# Altium PCB Control Board-v1.0.PcbDoc (part 5 of 8)
Units mil, origin at the board's own origin, x right, y up, seen from the top; angles counter-clockwise.
Board outline 7874.02 x 5118.11 mil, 4 copper layers (Top Layer, Layer 1, Layer 2, Bottom Layer), stack 61.654 mil thick; 475 components, 366 nets, 1579 pads, 587 vias.
Unrouted connection lines stored in the file: 427.
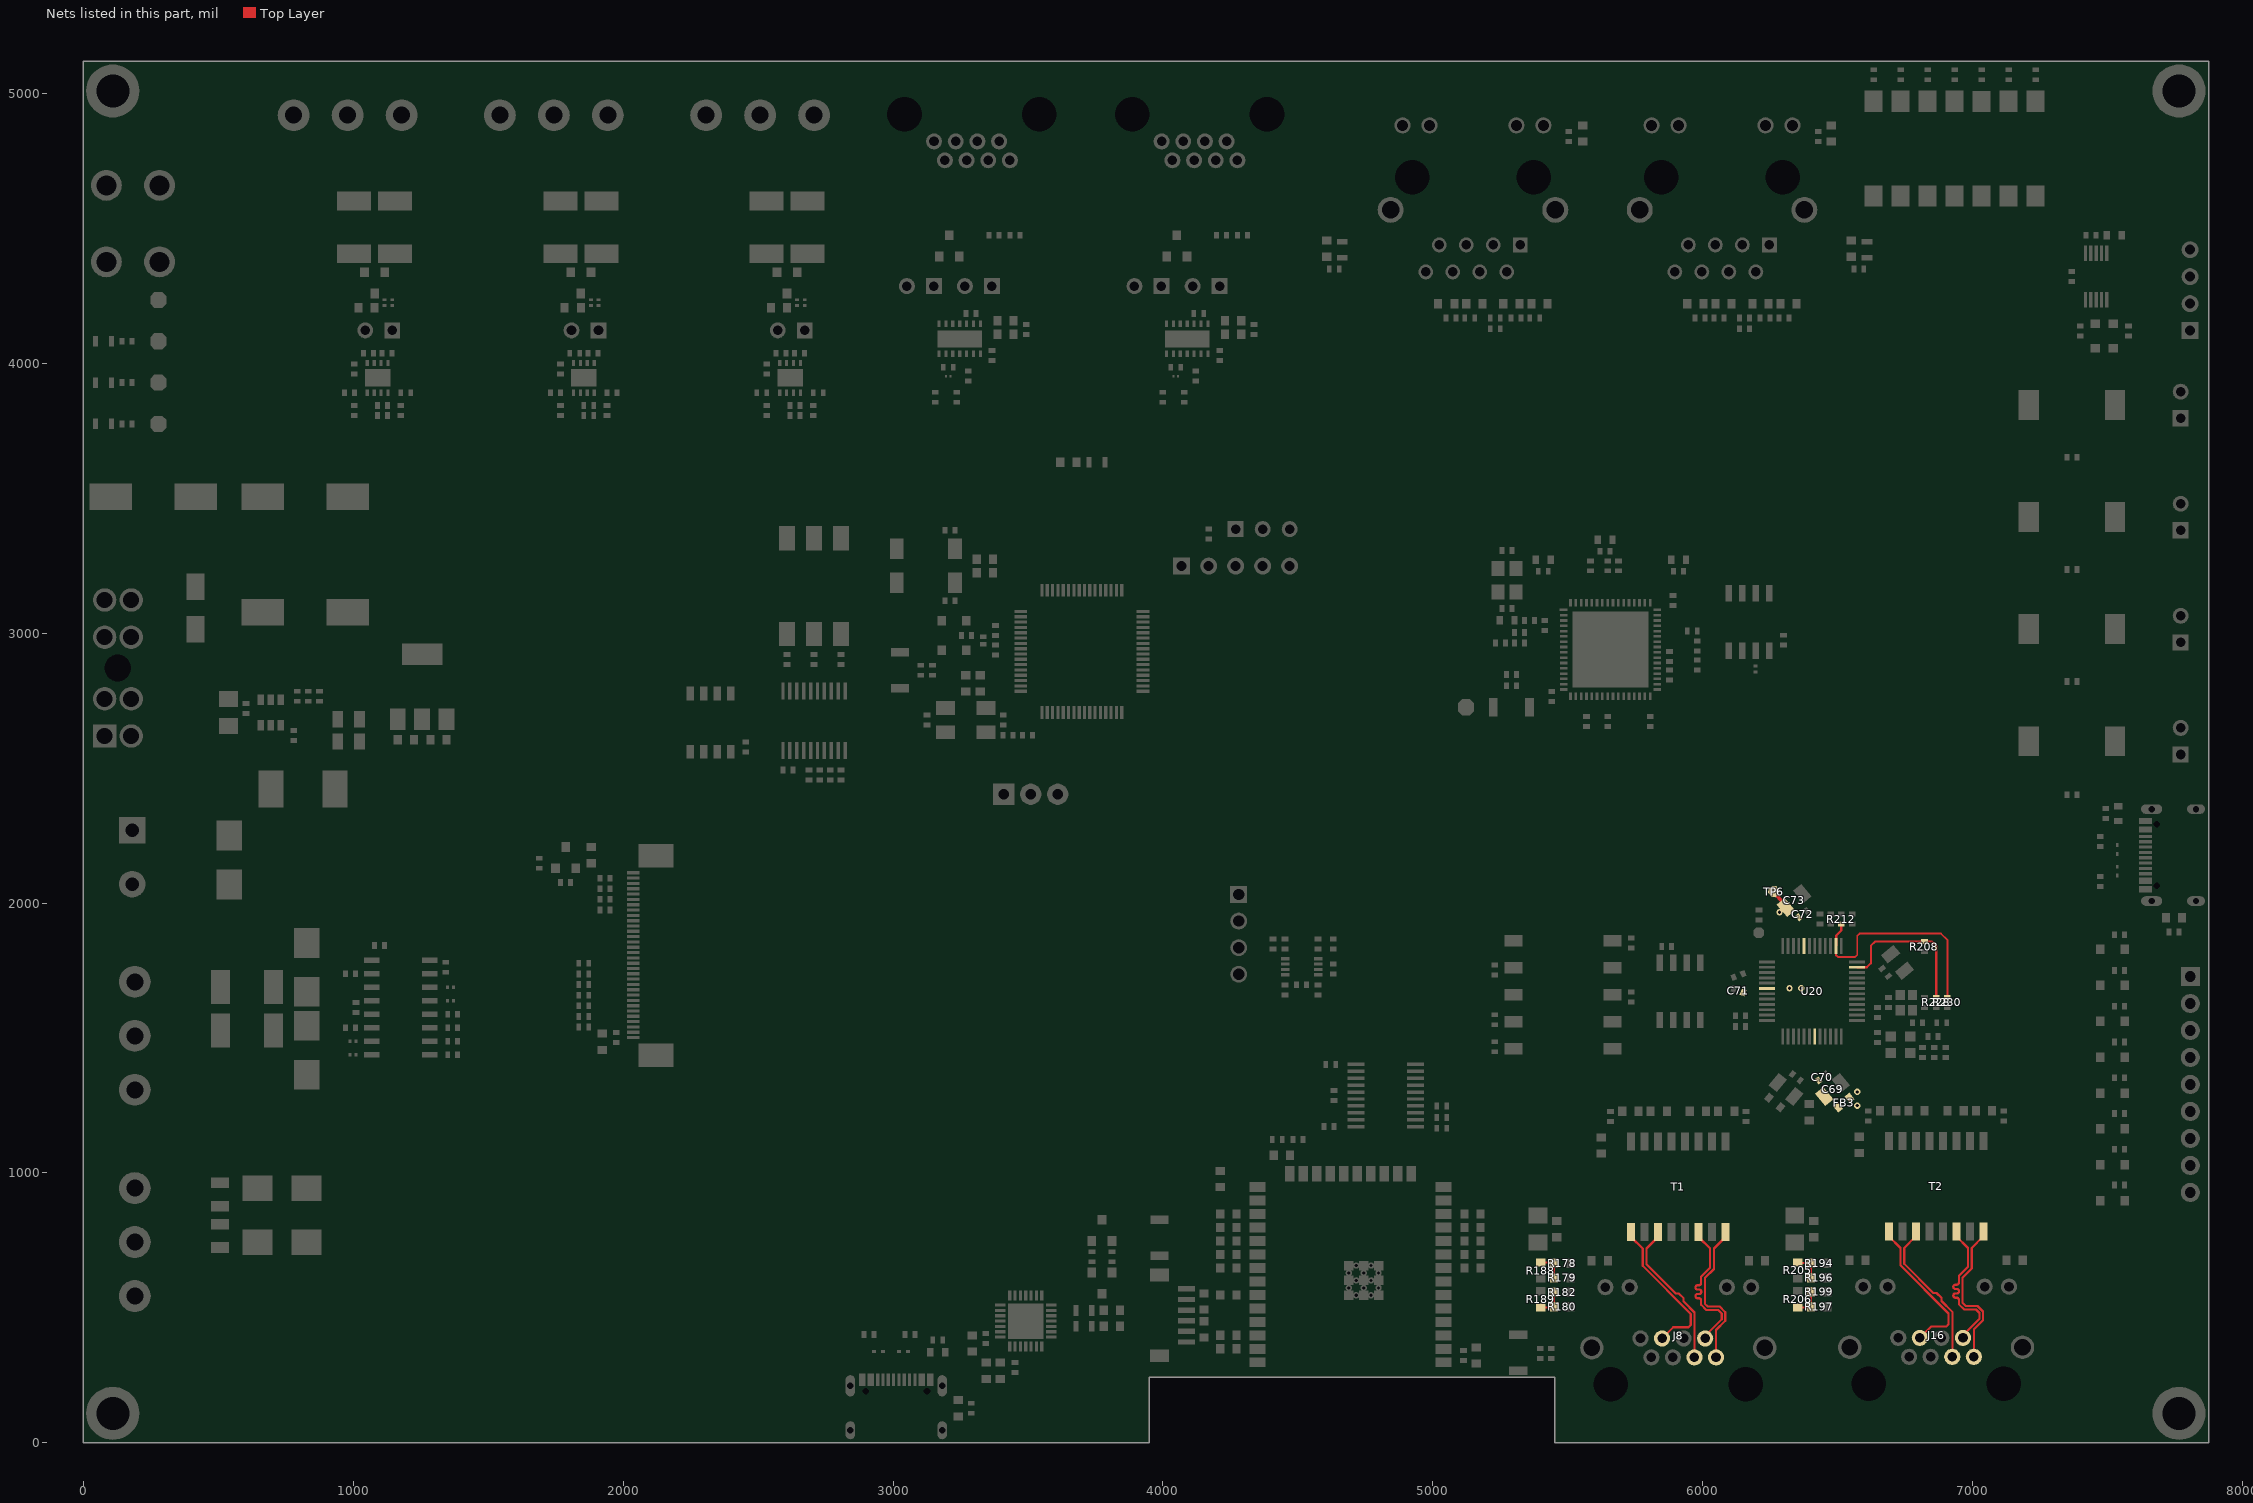
[diagram p4: the nets of this part, all layers, seen from the top]

## Part data (continued)
U5: "400kHz SO-8 I/O Expanders ROHS", Case/Package=SO, Clock Frequency=400kHz, LCSC Part Number=C2688883, Manufacturer="NXP Semiconductors", Max Operating Temperature=85°C, Max Power Dissipation=200mW, Min Operating Temperature=-40°C, Nominal Supply Voltage=5.5V, Operating Supply Current=85mA, Output Current=50mA, Package Quantity=1, Category="Interface ICs", ComponentLink1Description=https://datasheet.ciiva.com/8125/pca9536-8125671.pdf?src-supplier=Avnet, ComponentLink1URL=https://datasheet.ciiva.com/8125/pca9536-8125671.pdf?src-supplier=Avnet, ComponentLink2Description=https://datasheet.ciiva.com/1779/pca9536-1779979.pdf?src-supplier=Digi-Key, ComponentLink2URL=https://datasheet.ciiva.com/1779/pca9536-1779979.pdf?src-supplier=Digi-Key, ComponentLink3Description=https://datasheet.ciiva.com/1779/pca9536-1779980.pdf?src-supplier=Digi-Key, ComponentLink3URL=https://datasheet.ciiva.com/1779/pca9536-1779980.pdf?src-supplier=Digi-Key, ComponentLink4Description=https://datasheet.ciiva.com/1779/pca9536-1779981.pdf?src-supplier=Digi-Key, ComponentLink4URL=https://datasheet.ciiva.com/1779/pca9536-1779981.pdf?src-supplier=Digi-Key, ComponentLink5Description=https://datasheet.ciiva.com/3148/pca9536-3148502.pdf?src-supplier=Avnet, ComponentLink5URL=https://datasheet.ciiva.com/3148/pca9536-3148502.pdf?src-supplier=Avnet, ComponentLink6Description=https://datasheet.ciiva.com/3149/pca9536-3149304.pdf?src-supplier=Avnet, ComponentLink6URL=https://datasheet.ciiva.com/3149/pca9536-3149304.pdf?src-supplier=Avnet, ComponentLink7Description=https://datasheet.ciiva.com/16291/pca9536-16291035.pdf?src-supplier=Future+Electronics, ComponentLink7URL=https://datasheet.ciiva.com/16291/pca9536-16291035.pdf?src-supplier=Future+Electronics, Frequency=400kHz, Interface=I2C,SMBus,Serial, Item Type=IC, Lead Free="Lead Free", Manufacturer Part Number=PCA9536D,118, Mounting Technology="Surface Mount", Number of I/Os=4, Operating Supply Voltage=5.5V, Packaging="Tape and Reel", Pins=8, Pricing="494=0.72487, 500=0.70966, 990=0.68938, 2500=0.67925, 5000=0.66404, 25000=0.64883, 50000=0.62856 (USD)", RoHS=Yes, RoHS Compliant=Yes, Series=-, Stock=96987, Supplier=Avnet, Supplier Part Number=PCA9536D,118, Supply Current=85mA, Weight=0.01787oz
U6: "RX TXRX MOD WIFI TRACE ANT SMD", LCSC Part Number=C701343, Manufacturer="Espressif Systems", Supplier Part Number 1=1965-ESP32-WROOM-32E-N16CT-ND, Category=Uncategorized, Item Type=IC, Manufacturer Part Number=ESP32-WROOM-32E-N16, Pricing 1="1=3.60000 (USD)", RoHS=No, Stock 1=16240, Supplier 1=Digi-Key
U7: "IC REG BUCK ADJ 3A TSOT26", Case/Package=SOT-23-6, LCSC Part Number=C2158012, Manufacturer=Diodes, Max Operating Temperature=85°C, Max Output Voltage=31V, Max Supply Voltage=32V, Min Input Voltage=3.8V, Min Operating Temperature=-40°C, Min Output Voltage=800mV, Output Current=3A, Supplier Part Number=31-AP63300WU-7CT-ND, Switching Frequency=500kHz, Category="Voltage Regulators - Switching", ComponentLink1Description=https://www.diodes.com/assets/Datasheets/AP63300-AP63301.pdf?src-supplier=Digikey, ComponentLink1URL=https://www.diodes.com/assets/Datasheets/AP63300-AP63301.pdf?src-supplier=Digikey, ComponentLink2Description=https://datasheet.octopart.com/AP63300WU-7-Diodes-Inc.-datasheet-149521342.pdf?src-supplier=Future+Electronics, ComponentLink2URL=https://datasheet.octopart.com/AP63300WU-7-Diodes-Inc.-datasheet-149521342.pdf?src-supplier=Future+Electronics, Item Type=IC, Manufacturer Part Number=AP63300WU-7, Mounting Technology="Surface Mount", Number of Outputs=1, Output Configuration=Positive, Output Type=Adjustable, Pricing="1=0.92, 10=0.818, 25=0.7764, 100=0.6379, 250=0.59628, 500=0.52696, 1000=0.41602 (USD)", RoHS=No, RoHS Compliant=Yes, Series=-, Stock=11398, Supplier=Digikey, Synchronous Rectifier=Yes
U8: "70dB@(100Hz) 1.5A Fixed 3.3V~3.3V Positive 6V SOT-223 Linear Voltage Regulators (LDO) ROHS", LCSC Part Number=C401677, Manufacturer="BL(Shanghai Belling)", Package=SOT-223, ComponentLink1Description=LCSC, ComponentLink1URL=https://www.lcsc.com/product-detail/Linear-Voltage-Regulators-LDO_BL-Shanghai-Belling-BL8071CLATR33_C401677.html, Item Type=IC, Manufacturer Part Number=BL8071CLATR33
U9 U10: "IC TRANSCEIVER HALF 1/1 14VSON", LCSC Part Number=C5215823, Manufacturer="Texas Instruments", Supplier Part Number=595-TCAN1463DMTRQ1, Item Type=IC, Manufacturer Part Number=TCAN1463DMTRQ1, Pricing="1=2.47, 10=2.22, 50=2.22, 100=1.78, 1000=1.21, 10000=1.09 (USD)", RoHS=Yes, Stock=20610, Supplier=Mouser
U11: "8-bit I2C IO Expander 20TSSOP", LCSC Part Number=C94361, Manufacturer="Texas Instruments", Supplier Part Number=595-PCF8574APWR, Category="Interface ICs", ComponentLink1Description=https://datasheet.ciiva.com/23785/1534147-23785504.pdf?src-supplier=Newark, ComponentLink1URL=https://datasheet.ciiva.com/23785/1534147-23785504.pdf?src-supplier=Newark, ComponentLink2Description=https://datasheet.ciiva.com/15134/getdatasheetpartid-253002-15134574.pdf?src-supplier=Verical, ComponentLink2URL=https://datasheet.ciiva.com/15134/getdatasheetpartid-253002-15134574.pdf?src-supplier=Verical, ComponentLink3Description=https://datasheet.ciiva.com/3149/pcf8574a-3149721.pdf?src-supplier=Avnet, ComponentLink3URL=https://datasheet.ciiva.com/3149/pcf8574a-3149721.pdf?src-supplier=Avnet, ComponentLink4Description=https://datasheet.ciiva.com/3149/pcf8574a-3149799.pdf?src-supplier=Avnet, ComponentLink4URL=https://datasheet.ciiva.com/3149/pcf8574a-3149799.pdf?src-supplier=Avnet, ComponentLink5Description=https://datasheet.ciiva.com/7747/1768199-7747660.pdf?src-supplier=Element14, ComponentLink5URL=https://datasheet.ciiva.com/7747/1768199-7747660.pdf?src-supplier=Element14, ComponentLink6Description=https://datasheet.ciiva.com/1780/pcf8574a-1780187.pdf?src-supplier=Digi-Key, ComponentLink6URL=https://datasheet.ciiva.com/1780/pcf8574a-1780187.pdf?src-supplier=Digi-Key, ComponentLink7Description=https://datasheet.ciiva.com/1780/pcf8574a-1780188.pdf?src-supplier=Digi-Key, ComponentLink7URL=https://datasheet.ciiva.com/1780/pcf8574a-1780188.pdf?src-supplier=Digi-Key, ComponentLink8Description=https://datasheet.ciiva.com/1780/pcf8574a-1780189.pdf?src-supplier=Digi-Key, ComponentLink8URL=https://datasheet.ciiva.com/1780/pcf8574a-1780189.pdf?src-supplier=Digi-Key, Item Type=IC, Length=6.5mm, Manufacturer Part Number=PCF8574APWR, Pricing="1=1.54, 10=1.38, 50=1.38, 100=1.07, 1000=0.78, 10000=0.707 (USD)", RoHS=Yes, Stock=4215, Supplier=Mouser, Thickness=1mm, Width=4.4mm
U12: "IC EEPROM 2KBIT I2C 1MHZ 8SOIC", LCSC Part Number=C6203, Manufacturer=Microchip, ComponentLink1Description=https://datasheet.ciiva.com/5700/1626965-5700961.pdf?src-supplier=Farnell, ComponentLink1URL=https://datasheet.ciiva.com/5700/1626965-5700961.pdf?src-supplier=Farnell, ComponentLink2Description=https://datasheet.ciiva.com/15123/getdatasheetpartid-257563-15123318.pdf?src-supplier=Verical, ComponentLink2URL=https://datasheet.ciiva.com/15123/getdatasheetpartid-257563-15123318.pdf?src-supplier=Verical, ComponentLink3Description=https://datasheet.ciiva.com/6614/at24c01c-2c-6614231.pdf?src-supplier=Digikey, ComponentLink3URL=https://datasheet.ciiva.com/6614/at24c01c-2c-6614231.pdf?src-supplier=Digikey, ComponentLink4Description=https://datasheet.ciiva.com/6614/at24c01c-2c-6614232.pdf?src-supplier=Digikey, ComponentLink4URL=https://datasheet.ciiva.com/6614/at24c01c-2c-6614232.pdf?src-supplier=Digikey, ComponentLink5Description=https://datasheet.ciiva.com/6614/at24c01c-2c-6614233.pdf?src-supplier=Digikey, ComponentLink5URL=https://datasheet.ciiva.com/6614/at24c01c-2c-6614233.pdf?src-supplier=Digikey, ComponentLink6Description=https://datasheet.ciiva.com/22729/1626965-22729483.pdf?src-supplier=Element14, ComponentLink6URL=https://datasheet.ciiva.com/22729/1626965-22729483.pdf?src-supplier=Element14, ComponentLink7Description=https://datasheet.ciiva.com/22618/1626965-22618568.pdf?src-supplier=Element14, ComponentLink7URL=https://datasheet.ciiva.com/22618/1626965-22618568.pdf?src-supplier=Element14, Item Type=IC, Manufacturer Part Number=AT24C02C-SSHM-T, Pricing="1=0.25, 100=0.2369 (USD)", RoHS=Yes, Supplier=Digikey
U13: "IC TRANSLTR BIDIRECTIONAL 8VSSOP", Case/Package=VSSOP, High Level Output Current=-20uA, LCSC Part Number=C60709, Low Level Output Current=20uA, Manufacturer="Texas Instruments", Max Operating Temperature=85°C, Max Supply Voltage=5.5V, Min Operating Temperature=-40°C, Min Supply Voltage=1.2V, Nominal Supply Current=3.5uA, Package Quantity=3000, Supplier Part Number=296-22862-1-ND, Category="Voltage Level Shifters", Channel Type=Bidirectional, ComponentLink1Description=https://datasheet.ciiva.com/7744/1634161-7744195.pdf?src-supplier=Element14, ComponentLink1URL=https://datasheet.ciiva.com/7744/1634161-7744195.pdf?src-supplier=Element14, ComponentLink2Description=https://datasheet.ciiva.com/22677/1699360-22677930.pdf?src-supplier=Element14, ComponentLink2URL=https://datasheet.ciiva.com/22677/1699360-22677930.pdf?src-supplier=Element14, ComponentLink3Description=https://datasheet.ciiva.com/4226/sces641b-4226960.pdf?src-supplier=Arrow+Electronics, ComponentLink3URL=https://datasheet.ciiva.com/4226/sces641b-4226960.pdf?src-supplier=Arrow+Electronics, ComponentLink4Description=https://datasheet.ciiva.com/15096/getdatasheetpartid-214907-15096235.pdf?src-supplier=Verical, ComponentLink4URL=https://datasheet.ciiva.com/15096/getdatasheetpartid-214907-15096235.pdf?src-supplier=Verical, ComponentLink5Description=https://datasheet.ciiva.com/6132/txb0102-6132717.pdf?src-supplier=Farnell, ComponentLink5URL=https://datasheet.ciiva.com/6132/txb0102-6132717.pdf?src-supplier=Farnell, ComponentLink6Description=https://datasheet.ciiva.com/46384/1874809-46384198.pdf?src-supplier=Element14, ComponentLink6URL=https://datasheet.ciiva.com/46384/1874809-46384198.pdf?src-supplier=Element14, ComponentLink7Description=https://datasheet.ciiva.com/1899/txb0102-1899430.pdf?src-supplier=Digikey, ComponentLink7URL=https://datasheet.ciiva.com/1899/txb0102-1899430.pdf?src-supplier=Digikey, ComponentLink8Description=https://datasheet.ciiva.com/1899/txb0102-1899429.pdf?src-supplier=Digikey, ComponentLink8URL=https://datasheet.ciiva.com/1899/txb0102-1899429.pdf?src-supplier=Digikey, ComponentLink9Description=https://datasheet.ciiva.com/1899/txb0102-1899431.pdf?src-supplier=Digikey, ComponentLink9URL=https://datasheet.ciiva.com/1899/txb0102-1899431.pdf?src-supplier=Digikey, ComponentLink10Description=https://datasheet.ciiva.com/14287/txb0102-14287496.pdf?src-supplier=Avnet, ComponentLink10URL=https://datasheet.ciiva.com/14287/txb0102-14287496.pdf?src-supplier=Avnet, ComponentLink11Description=LCSC, ComponentLink11URL=https://www.lcsc.com/product-detail/Translators-Level-Shifters_Texas-Instruments-TXB0102DCUR_C60709.html, Data Rate=100Mbps, Height=900um, Lead Free="Lead Free", Length=2.3mm, Logic Function=Translator, Manufacturer Part Number=TXB0102DCUR, Mounting Technology="Surface Mount", Number of Bits=2, Number of Circuits=1, Number of Inputs=1NUMBER, Number of Outputs=1NUMBER, Output Type=3-STATE, Packaging="Tape and Reel", Pins=8, Pricing="1=0.69, 10=0.606, 25=0.5696, 100=0.4649, 250=0.4318, 500=0.36748, 1000=0.29398 (USD)", Propagation Delay=7.4ns, Radiation Hardening=No, Reach SVHC Compliant=No, RoHS=Yes, RoHS Compliant=Yes, Series=-, Stock=10593, Supplier=Digikey, Thickness=850um, Turn-On Delay Time=31ns, Type=IC, Weight=0.000339oz, Width=2mm
U14: "250Kbps transceiver 2/2 SOP-16 RS232 ICs ROHS", LCSC Part Number=C2904738, Manufacturer=UMW, Package=SOP-16, ComponentLink1Description=LCSC, ComponentLink1URL=https://www.lcsc.com/product-detail/RS232-ICs_UMW-Youtai-Semiconductor-Co-Ltd-MAX3232ESE_C2904738.html, Item Type=IC, Manufacturer Part Number=MAX3232ESE
U15 U16 U17: "IC TRANSCEIVER HALF 1/1 8SON", LCSC Part Number=C2878080, Manufacturer="Texas Instruments", Supplier Part Number=296-THVD2450DRBRCT-ND, Height=1mm, Item Type=IC, Length=3mm, Manufacturer Part Number=THVD2450DRBR, Pins=8NUMBER, Pricing="1=4.05, 10=3.639, 25=3.4404, 100=2.9818, 250=2.82892, 500=2.53838, 1000=2.1408 (USD)", RoHS=Yes, Stock=2652, Supplier=Digikey, Thickness=880um, Width=3mm
U18: "2/3-PORT ETHERCAT SLAVE CTLR", Manufacturer=Microchip, Manufacturer Part Number=LAN9253-I/R4X, Supplier Part Number=150-LAN9253-I/R4X-ND, ComponentLink1Description="SVN Datasheet", ComponentLink2Description="Local Datasheet", ComponentLink5Description="Open Footprint 2", ComponentLink6Description="Open Footprint 3", Item Type=IC, Pricing="1=13.43, 25=11.2, 100=10.825 (USD)", Revision=2, RoHS=Yes, Stock=364, Supplier=Digikey
U19: "IC EEPROM 256KBIT I2C 1MHZ 8SOIC", Case/Package=SOIC, Frequency=400kHz, Manufacturer="ON Semiconductor", Max Operating Temperature=85°C, Max Supply Voltage=5.5V, Min Operating Temperature=-40°C, Min Supply Voltage=1.8V, Nominal Supply Current=3mA, Operating Supply Voltage=5V, Package Quantity=1, Supplier Part Number 1=8080199P, Access Time=900ns, Access Time-Max=900ns, Category=EEPROM, ComponentLink1Description=https://datasheet.ciiva.com/8072/1780696-8072142.pdf?src-supplier=Element14, ComponentLink1URL=https://datasheet.ciiva.com/8072/1780696-8072142.pdf?src-supplier=Element14, ComponentLink2Description=https://datasheet.ciiva.com/46391/1792913-46391371.pdf?src-supplier=Element14, ComponentLink2URL=https://datasheet.ciiva.com/46391/1792913-46391371.pdf?src-supplier=Element14, ComponentLink3Description=https://datasheet.ciiva.com/4859/cat24c256-d-105771-4859816.pdf?src-supplier=Mouser, ComponentLink3URL=https://datasheet.ciiva.com/4859/cat24c256-d-105771-4859816.pdf?src-supplier=Mouser, ComponentLink4Description=https://datasheet.ciiva.com/16427/cat24c256-d-16427973.pdf?src-supplier=Future+Electronics, ComponentLink4URL=https://datasheet.ciiva.com/16427/cat24c256-d-16427973.pdf?src-supplier=Future+Electronics, Contact Plating=Gold, Density=256Kb, Halogen Free="Halogen Free", Height=1.5mm, Interface=I2C,Serial,2-Wire, Lead Free="Lead Free", Length=5mm, Manufacturer Part Number=CAT24C256WI-GT3, Max Frequency=400kHz, Memory Size=256Kb, Memory Type=EEPROM, Mount="Surface Mount", Number of Pins=8, Number of Words=32000, Organization=32KX8, Packaging="Tape and Reel", Pricing 1="100=0.19900, 200=0.19400, 500=0.18900, 1000=0.18400 (GBP)", Radiation Hardening=No, REACH SVHC="No SVHC", RoHS=Yes, RoHS Compliant=Yes, Series=-, Stock 1=300, Supplier 1=RSComponents, Supply Current=3mA, Supply Voltage-Nom=5.5V, Width=4mm, Write Cycle Time-Max (tWC)=5ms, Write Protection=YES
U20: "IC ETHERNET SWITCH 3PORT 48-LQFP", LCSC Part Number=C631675, Manufacturer=Microchip, ComponentLink1Description=https://datasheet.ciiva.com/1141/ksz8863mll-fll-rll-ds-1141682.pdf?src-supplier=Element14, ComponentLink1URL=https://datasheet.ciiva.com/1141/ksz8863mll-fll-rll-ds-1141682.pdf?src-supplier=Element14, ComponentLink2Description=https://datasheet.ciiva.com/16367/ksz8863mll-fll-rll-ds-16367589.pdf?src-supplier=Future+Electronics, ComponentLink2URL=https://datasheet.ciiva.com/16367/ksz8863mll-fll-rll-ds-16367589.pdf?src-supplier=Future+Electronics, Item Type=IC, Lead Free=5697LeadFree, Manufacturer Part Number=KSZ8863RLLI, Pricing="1=6.57, 25=5.47, 100=5.2875 (USD)", RoHS=Yes, Stock=2925, Supplier=Digikey
X1: library part "MC-306 32.7680K-A0:ROHS", "32.768kHz 12.5pF ±20ppm MC-306 Crystals ROHS", LCSC Part Number=C2650464, Manufacturer="Seiko Epson", ComponentLink1Description=LCSC, ComponentLink1URL=https://www.lcsc.com/product-detail/Crystals_Seiko-Epson-MC-306-32-7680K-A0-ROHS_C2650464.html, Item Type=Crystal, Manufacturer Part Number="MC-306 32.7680K-A0:ROHS"
X2: library part 5TJ480000XYLBC, "8MHz 18pF ±10ppm SMD5032-4P Crystals ROHS", LCSC Part Number=C2149247, Manufacturer=JYJE, Package=SMD5032-4P, ComponentLink1Description=LCSC, ComponentLink1URL=https://www.lcsc.com/product-detail/Crystals_JYJE-5TJ480000XYLBC_C2149247.html, Item Type=Crystal, Manufacturer Part Number=5TJ480000XYLBC
X3: library part X322525MRB4SI, "25MHz 贴片晶振 18pF ±10ppm ±20ppm SMD3225-4P Crystals ROHS", LCSC Part Number=C70593, Manufacturer=YXC, Item Type=Crystal, Manufacturer Part Number=X322525MRB4SI, RoHS=No, Supplier=LCSC
X4: library part ECS-2033-250-BN, "XTAL OSC XO 25.0000MHZ CMOS SMD", LCSC Part Number=C2441279, Manufacturer="ECS International", ComponentLink1Description=https://datasheet.ciiva.com/865/ecs-2025-2033-865424.pdf?src-supplier=Digikey, ComponentLink1URL=https://datasheet.ciiva.com/865/ecs-2025-2033-865424.pdf?src-supplier=Digikey, ComponentLink2Description=https://datasheet.ciiva.com/865/ecs-2025-2033-865425.pdf?src-supplier=Digikey, ComponentLink2URL=https://datasheet.ciiva.com/865/ecs-2025-2033-865425.pdf?src-supplier=Digikey, ComponentLink3Description=https://datasheet.ciiva.com/865/ecs-2025-2033-865426.pdf?src-supplier=Digikey, ComponentLink3URL=https://datasheet.ciiva.com/865/ecs-2025-2033-865426.pdf?src-supplier=Digikey, Item Type=Oscillators, Manufacturer Part Number=ECS-2033-250-BN, Pricing="1=2.82, 10=2.757, 50=2.626, 100=2.2978, 500=2.2321 (USD)", RoHS=Yes, Stock=33494, Supplier=Digikey
X5: library part Q22FA12800090, "CRYSTAL 25.0000MHZ 12PF SMD", LCSC Part Number=C255883, Manufacturer="Seiko Epson", Package=SMD2016-4P, ComponentLink1Description=LCSC, ComponentLink1URL=https://www.lcsc.com/product-detail/Crystals_Seiko-Epson-Q22FA12800090_C255883.html, Item Type=Crystal, Manufacturer Part Number=Q22FA12800090

## Free pads (board coordinates)
  round 196.85 hole 122.05: MH1(109.33,109.44) MH1(109.33,5008.68) MH1(7764.29,109.44) MH1(7764.29,5008.68)

## Via types
v1: diameter 23.62, hole 11.81, Top Layer to Bottom Layer, 587 vias

## Nets (pads, with @x,y where several pads share a name; then routed paths per layer and width w, separated by ;. In a path a pad name is that pad's centre, name@x,y a point inside that pad or via, vN(x,y) a via of type N, cw(c..) or ccw(c..) an arc to the next point about the centre after c; other vN are vias at no path point)
1P45: R178.2 R179.2 R188.2 | length 104.5
  Top Layer w8: R188.2@5400.04,668.5 5445.7,668.5 R178.2@5449.04,665.16 R179.2@5449.04,611
1P78: R180.2 R182.2 R189.2 | length 103.3
  Top Layer w8: R189.2@5400.04,502 5446.04,502 R180.2@5449.04,505 R182.2@5449.04,558.08
1RX_N: J8.6 T1.9 | length 562.7
  Top Layer w8: T1.9@5734.08,781 5734.08,763.09 5777.08,720.09 5777.08,655.77 5955.24,477.6 5955.24,436.94 5946.94,428.64 5890.44,428.64 J8.6@5848.84,387.04
1RX_P: J8.3 T1.11 | length 562.1
  Top Layer w8: T1.11@5834.08,781 5834.08,763.09 5791.08,720.09 5791.08,661.56 5899.04,553.6 5910.59,553.6 5928.76,535.44 5928.76,523.88 5969.24,483.4 J8.3@5969.24,317.28
1TX_N: J8.2 T1.14 | length 565.8
  Top Layer w8: T1.14@5984.08,781 5984.08,763.09 6027.08,720.09 6027.08,650.04 5993.49,616.45 5993.49,606.8 5993.49,591.88 cw(c5985.49,591.88) 5985.49,583.88 5980.73,583.88 ccw(c5980.73,575.88) 5980.73,567.88 5986.49,567.88 cw(c5986.49,559.88) 5986.49,551.88 5980.73,551.88 ccw(c5980.73,543.88) 5980.73,535.88 5985.49,535.88 cw(c5985.49,527.88) 5993.49,527.88 5993.49,523.88 5993.49,511.6 6012.97,492.12 6056.73,492.12 6069.76,479.09 6069.76,457.64 6008.68,396.56 J8.2@6008.68,387.04
1TX_P: J8.1 T1.16 | length 566.6
  Top Layer w8: J8.1@6048.84,316.96 6048.84,418.34 6082.76,452.26 6082.76,484.48 6062.12,505.12 6018.36,505.12 6007.49,515.99 6007.49,610.65 6041.08,644.24 6041.08,720.09 6084.08,763.09 T1.16@6084.08,781
2P45: R194.2 R196.2 R205.2 | length 104.4
  Top Layer w8: R205.2@6352,668.92 6354.92,666 R194.2@6401,666 R196.2@6401,611.84
2P78: R197.2 R199.2 R206.2 | length 104.3
  Top Layer w8: R206.2@6352,502.08 6398,502.08 R197.2@6401,505.08 R199.2@6401,559.16
2RX_N: J16.6 T2.9 | length 562.7
  Top Layer w8: T2.9@6689.16,783.04 6689.16,765.13 6732.16,722.13 6732.16,657.81 6910.32,479.64 6910.32,438.98 6902.02,430.68 6845.52,430.68 J16.6@6803.92,389.08
2RX_P: J16.3 T2.11 | length 562.1
  Top Layer w8: T2.11@6789.16,783.04 6789.16,765.13 6746.16,722.13 6746.16,663.6 6854.12,555.64 6865.67,555.64 6883.84,537.48 6883.84,525.92 6924.32,485.44 J16.3@6924.32,319.32
2TX_N: J16.2 T2.14 | length 565.8
  Top Layer w8: T2.14@6939.16,783.04 6939.16,765.13 6982.16,722.13 6982.16,652.08 6948.57,618.49 6948.57,608.84 6948.57,593.92 cw(c6940.57,593.92) 6940.57,585.92 6935.81,585.92 ccw(c6935.81,577.92) 6935.81,569.92 6941.57,569.92 cw(c6941.57,561.92) 6941.57,553.92 6935.81,553.92 ccw(c6935.81,545.92) 6935.81,537.92 6940.57,537.92 cw(c6940.57,529.92) 6948.57,529.92 6948.57,525.92 6948.57,513.64 6968.05,494.16 7011.81,494.16 7024.84,481.13 7024.84,459.68 6963.76,398.6 J16.2@6963.76,389.08
2TX_P: J16.1 T2.16 | length 566.6
  Top Layer w8: J16.1@7003.92,319 7003.92,420.38 7037.84,454.3 7037.84,486.52 7017.2,507.16 6973.44,507.16 6962.57,518.03 6962.57,612.69 6996.16,646.28 6996.16,722.13 7039.16,765.13 T2.16@7039.16,783.04
50M_CLKI: R208.1 R228.1 U20.23 | length 567.1
  Top Layer w8: U20.23@6571.83,1762.26 6607.72,1762.26 6622.52,1777.06 6622.52,1841.49 6638.28,1857.25 R208.1@6821.1,1857.25 6847.87,1857.25 6864.74,1840.39 R228.1@6864.74,1650.28
50M_CLKO: R212.2 R230.1 U20.26 | length 839
  Top Layer w7: U20.26@6493.08,1841 6493.95,1840.13 6493.95,1806.18 6499.97,1800.16 6564.43,1800.16 6571.83,1807.56 6571.83,1878.3 6580.4,1886.87 6882.28,1886.87 6905.74,1863.42 R230.1@6905.74,1650.28
  Top Layer w8: U20.26@6493.08,1841 6494.26,1842.18 6494.26,1879.48 6512.78,1898 R212.2@6512.78,1922.18
+1.8V: C71.2 C72.2 C73.2 FB3.1 TP6.1 U20.32 U20.42 | length 73.7
  Top Layer w15: TP6.1@6262.77,2042.35 6268.78,2034.55 6295.28,2002.96 C73.2@6307.73,1984.04
  other v1: 6571.69,1249.53 6571.69,1300.35 6321.24,1684.1 6364.19,1684.1 6283.78,1966.19
+1.8V-A: C69.2 C70.2 FB3.2 U20.7